# Altium PCB A313.2.PcbDoc (part 2 of 3)
Units mm, origin at the board's own origin, x right, y up, seen from the top; angles counter-clockwise.
Board outline 230.01 x 157.01 mm, 2 copper layers (Top Layer, Bottom Layer); 268 components, 266 nets, 1114 pads, 1214 vias.
Unrouted connection lines stored in the file: 2.
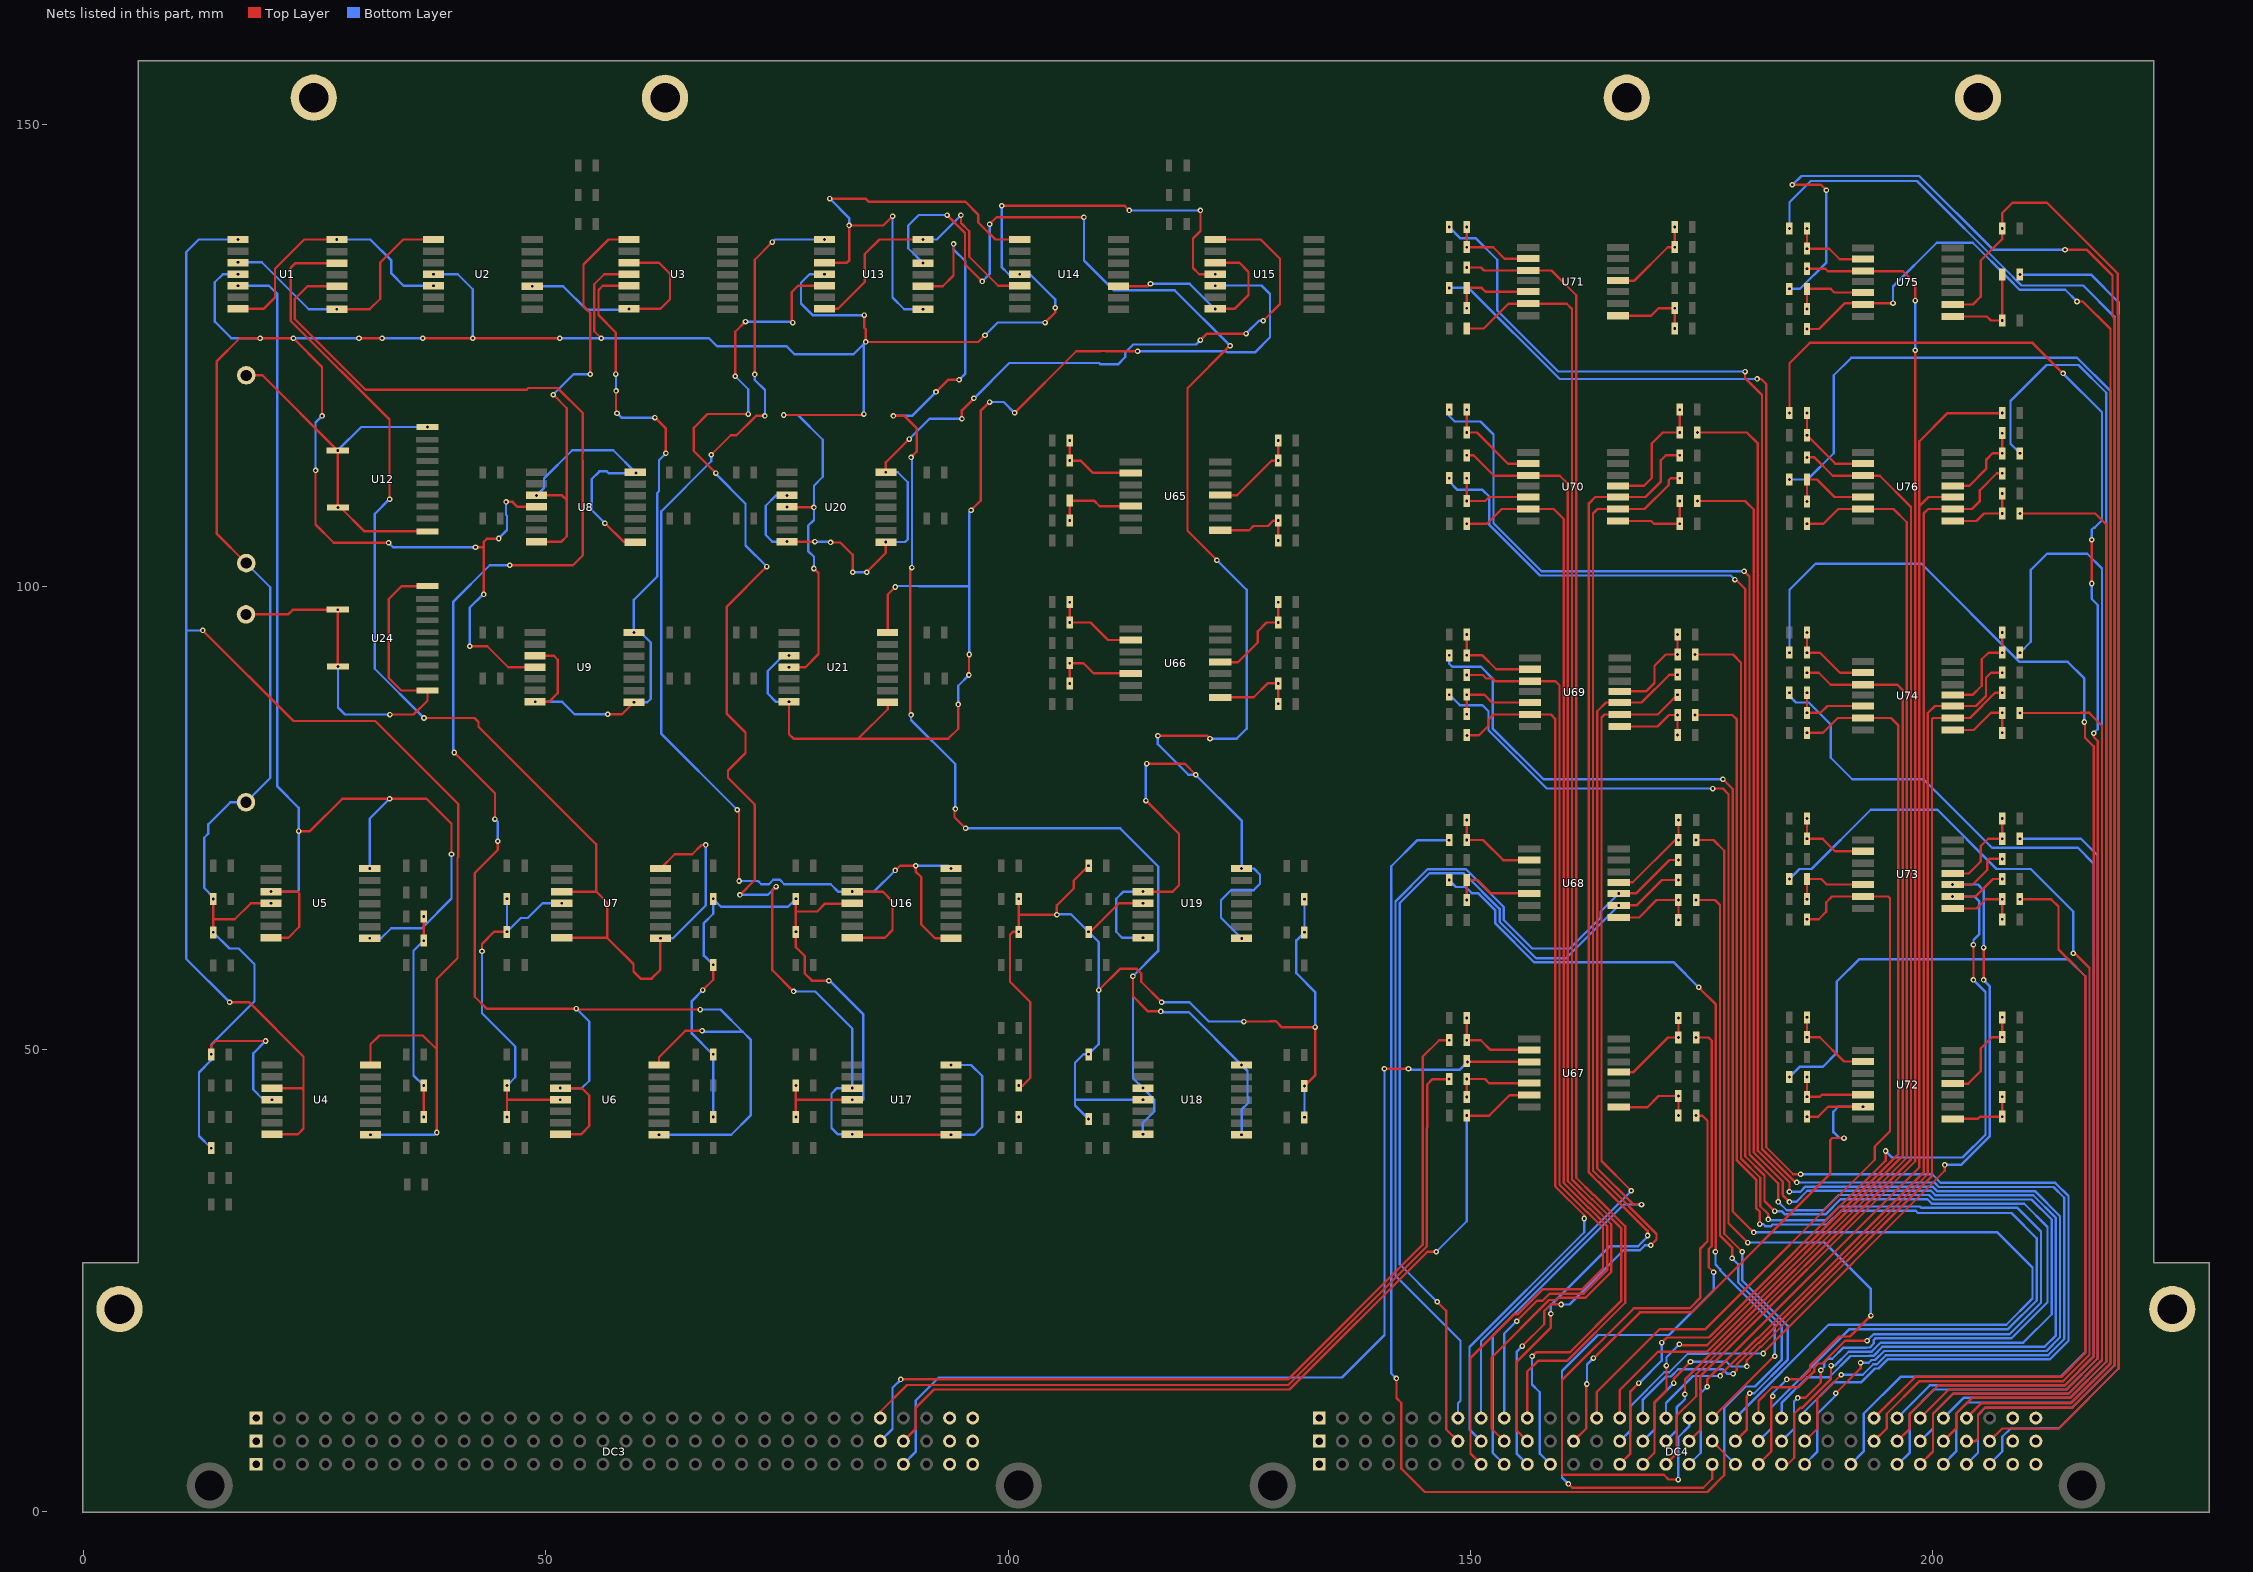
[diagram p2: the nets of this part, all layers, seen from the top]

## Via types
v1: diameter 0.6, hole 0.3, Top Layer to Bottom Layer, 1214 vias

## Nets (pads, with @x,y where several pads share a name; then routed paths per layer and width w, separated by ;. In a path a pad name is that pad's centre, name@x,y a point inside that pad or via, vN(x,y) a via of type N, cw(c..) or ccw(c..) an arc to the next point about the centre after c; other vN are vias at no path point) (continued)
A: D1.1 D2.1 DC3.A1 DC3.A31 DC3.A32 DC3.B1 DC3.B31 DC3.B32 DC3.C1 DC3.C31 DC3.C32 DC4.A1 DC4.A31 DC4.A32 DC4.B1 DC4.B31 DC4.B32 DC4.C1 DC4.C31 DC4.C32 pad.2 R17.2 R19.2 R21.2 R23.2 R25.2 R27.2 R29.2 R31.2 R33.2 R35.2 R37.2 R39.2 R41.2 R43.2 R45.2 R47.2 R64.2 R66.2 R68.2 R70.2 R72.2 R74.2 R76.2 R78.2 R80.2 R82.2 R84.2 R86.2 R88.2 R90.2 R92.2 R94.2 U1.4 U2.4 U3.4 U4.4 U5.4 U6.4 U7.4 U8.4 U9.4 U13.4 U14.4 U15.4 U16.4 U17.4 U18.4 U19.4 U20.4 U21.4 | length 702.1
  Top Layer w0.254: v1(13.824,49.457) 13.824,50.424 14.3,50.9 v1(19.7,50.9) ; v1(14.024,62.656) 14.024,64.06 ; v1(14.024,66.253) 14.024,64.06 ; D1.1@17.6,102.573 14.4,105.773 14.4,124.4 16.9,126.9 v1(19.1,126.9) v1(22.7,126.9) 25.8,123.8 v1(25.8,118.5) ; v1(20.292,65.803) 18.103,65.803 16.36,64.06 14.024,64.06 ; v1(25.1,112.6) 25.1,106.753 27.072,104.781 v1(33,104.781) ; v1(29.8,126.9) v1(32.3,126.9) ; v1(36.7,126.9) v1(42.1,126.9) v1(51.5,126.9) ; v1(36.802,42.69) v1(36.802,46.074) ; v1(36.802,61.751) v1(36.802,64.353) ; v1(41.774,93.6) 43.669,93.6 45.943,91.326 U9.4@48.85,91.326 ; v1(42.4,104.3) 43.3,104.3 ; v1(43.1,60.6) 43.1,61.4 44.405,62.705 v1(45.8,62.705) ; v1(43.3,99.2) 43.3,104.3 ; v1(44.9,105.242) 44.858,105.2 43.62,105.2 43.3,104.88 43.3,104.3 ; v1(45.7,109.204) 46.409,109.204 46.955,108.658 U8.4@49,108.658 ; v1(45.8,42.69) 45.8,44.551 ; v1(45.8,46.074) 45.8,44.551 ; v1(51.575,44.551) 45.8,44.551 ; v1(56,126.9) 55.246,127.654 55.246,132.746 56.326,133.826 U3.4@58.995,133.826 ; v1(66.977,56.4) 68.101,57.524 v1(68.101,59.132) ; v1(75.738,118.6) 84.3,118.6 v1(84.4,118.7) ; v1(76.1,108.658) 76.15,108.608 v1(79,108.608) ; v1(76.3,91.326) 78.077,91.326 79.5,92.749 79.5,101.5 v1(79,102) ; v1(77.049,42.69) 77.049,44.646 ; v1(77.049,46.074) 77.049,44.646 ; v1(77.049,66.277) 77.049,64.9 ; v1(80.624,57.424) 78.776,57.424 78,58.2 78,60.094 77.049,61.044 v1(77.049,62.705) 77.049,64.9 ; v1(83.147,44.551) 77.143,44.551 77.049,44.646 ; U16.4@83.147,65.803 83.097,65.753 80.205,65.753 79.353,64.9 77.049,64.9 ; v1(84.45,129.401) 84.45,128.025 84.6,127.876 v1(84.6,126.5) 96.773,126.5 v1(97.5,127.227) ; v1(99.3,141.219) 112.605,141.219 v1(113.1,140.724) ; v1(101.15,46.074) 101.574,46.074 102.4,46.9 102.4,55.1 100.2,57.3 100.2,62.38 100.525,62.705 v1(101.15,62.705) 101.15,64.653 ; v1(101.15,66.277) 101.15,64.653 ; v1(104,128.6) 105.1,129.7 v1(105.1,130.2) ; v1(108.7,62.705) 108.902,62.705 112,65.803 v1(114.575,65.803) ; v1(108.7,69.85) 107.1,68.25 107.1,67.4 105.276,65.576 v1(105.276,64.553) 101.25,64.553 101.15,64.653 ; v1(109.8,56.4) 112.1,58.7 113.9,58.7 114.4,58.2 114.4,57.3 v1(116.6,55.1) ; v1(120.8,140.724) 120.8,138.5 120,137.7 120,134.5 120.674,133.826 v1(122.4,133.826) ; v1(125.5,53) 128.326,53 128.353,53.027 128.955,53.027 129.582,52.4 v1(133.2,52.4) 133.2,47.173 v1(132.051,46.024)
  Bottom Layer w0.254: v1(13.824,39.307) 12.493,40.638 12.493,47.5 13.824,48.831 v1(13.824,49.457) 13.824,50.524 18.501,55.201 18.501,59.199 16.8,60.9 15.78,60.9 v1(14.024,62.656) ; v1(14.024,66.253) 14.024,66.476 13.054,67.446 13.054,72.881 13.5,73.327 13.5,74.328 15.886,76.715 D2.1@17.575,76.715 20.2,79.34 20.2,99.973 D1.1@17.6,102.573 ; v1(16.725,133.826) 15.075,133.826 14.2,132.951 14.2,128.7 16,126.9 v1(19.1,126.9) ; v1(19.7,50.9) 18.354,49.554 18.354,45.646 19.449,44.551 v1(20.375,44.551) ; v1(22.7,126.9) v1(29.8,126.9) ; v1(25.1,112.6) 25.1,117.8 v1(25.8,118.5) ; v1(32.3,126.9) v1(36.7,126.9) ; v1(33,104.781) 33.481,104.3 v1(42.4,104.3) ; v1(36.802,46.074) 35.7,47.176 35.7,60.649 v1(36.802,61.751) ; v1(37.86,133.826) 40.474,133.826 42.1,132.2 v1(42.1,126.9) ; v1(41.774,93.6) 41.774,97.773 43.201,99.2 v1(43.3,99.2) ; v1(43.1,60.6) 43.1,53.9 46.7,50.3 46.7,46.974 v1(45.8,46.074) ; v1(44.9,105.242) 45.812,106.154 45.812,107.709 45.7,107.821 v1(45.7,109.204) ; v1(45.8,66.277) v1(45.8,62.705) 47.296,64.2 48.047,64.2 49.65,65.803 v1(51.719,65.803) ; v1(51.5,126.9) v1(56,126.9) 67.658,126.9 68.531,126.027 76.045,126.027 76.899,125.173 83.273,125.173 v1@84.4,126.3 ; v1(66.977,56.4) 65.8,55.223 65.8,51.7 68.043,49.457 v1(68.101,49.457) v1(68.101,42.69) ; v1(68.101,59.132) 67.1,60.133 67.1,63.654 68.101,64.655 v1(68.101,66.277) 68.978,65.4 76.172,65.4 v1(77.049,66.277) ; v1(75.738,118.6) 77.281,118.6 79.954,115.927 79.954,111.912 79,110.958 v1(79,108.608) 79,107.242 78.373,106.615 78.373,103.902 79,103.275 v1(79,102) ; v1(80.13,133.826) 78.526,133.826 77.6,132.9 77.6,130.657 78.856,129.401 v1(84.45,129.401) ; v1(80.624,57.424) 80.624,57.5 84.351,53.773 84.351,44.551 v1(83.147,44.551) ; v1(84.4,118.7) v1@84.4,126.3 ; v1(84.6,126.5) v1@84.4,126.3 ; v1(97.5,127.227) 98.873,128.6 v1(104,128.6) ; v1(99.3,141.219) 99.3,134.6 100.074,133.826 v1(101.265,133.826) 102.374,133.826 105.1,131.1 v1(105.1,130.2) ; v1(105.276,64.553) 105.324,64.6 106.805,64.6 v1(108.7,62.705) 109.8,61.605 v1(109.8,56.4) 109.8,50.557 v1(108.7,49.457) 108.157,49.457 107.239,48.539 107.239,44.6 ; v1(108.7,42.471) 107.239,43.933 107.239,44.6 ; v1(113.1,140.724) v1(120.8,140.724) ; v1(114.575,44.551) 107.287,44.551 107.239,44.6 ; v1(116.6,55.1) 119.6,55.1 121.7,53 v1(125.5,53) ; v1(132.051,42.64) v1(132.051,46.024) ; v1(132.051,66.227) v1(132.051,62.655) 131.173,61.777 131.173,58.227 133.2,56.2 v1(133.2,52.4)
  other v1: 101.15,42.69
AP_NU: DC4.A8 R143.2 U69.3 | length 105.8
  Top Layer w0.254: v1(149.599,90.481) 151.324,90.481 151.705,90.1 152.4,90.1 152.696,89.804 U69.3@156.45,89.804 159.196,89.804 159.63,89.37 159.63,35.36 162.563,32.427 162.601,32.427 164.329,30.699 164.329,26.305 162.059,24.035 157.793,24.035 155.085,21.327 154.699,21.327 150,16.628 150,6.271 DC4.A8@151.15,5.121
"AP_NU TTL": DC4.C19 R147.1 | length 161.8
  Top Layer w0.254: v1(177.3,79.2) 178.36,78.14 178.36,32.47 v1(180.63,30.2)
  Bottom Layer w0.254: v1(147.699,92.606) 147.699,91.701 148.014,91.386 151.114,91.386 152.4,90.1 152.4,84.7 157.9,79.2 v1(177.3,79.2) ; DC4.C19@178.65,10.121 188.729,20.2 207.958,20.2 210.792,23.034 210.792,26.408 207,30.2 v1(180.63,30.2)
"C1 TTL": DC4.C17 R125.1 | length 69.7
  Top Layer w0.254: v1(172.47,3.471) 171.429,3.471 170.906,3.994 160.034,3.994 159.9,4.128 159.9,14.228 167.677,22.005 173.737,22.005 174.873,23.141 174.873,28.473 175.636,29.236 175.636,42.273 175.079,42.831 v1(174.399,42.831)
  Bottom Layer w0.254: v1(172.47,3.471) 172.47,8.035 173.65,9.215 DC4.C17@173.65,10.121
"C2 TTL": DC4.A18 R128.1 | length 79.4
  Top Layer w0.254: v1(160.6,3) 161.027,2.573 175.173,2.573 176.15,3.55 DC4.A18@176.15,5.121 ; v1(174.399,51.282) 175.762,51.282 176.09,50.954 176.09,28.718 175.773,28.401 175.773,26.427 v1(176.3,25.9)
  Bottom Layer w0.254: v1(160.6,3) 159.9,3.7 159.9,15.2 163.8,19.1 171.474,19.1 176.3,23.926 v1(176.3,25.9)
"C3 TTL": DC4.B18 R135.1 | length 114
  Top Layer w0.254: v1(142,14.4) 142,12.3 142.523,11.777 142.523,4.654 145.058,2.119 175.623,2.119 177.452,3.948 177.452,6.319 DC4.B18@176.15,7.621 ; v1(147.676,72.62) R135.1@147.699,72.642
  Bottom Layer w0.254: v1(142,14.4) 141.446,14.954 141.446,69.807 144.259,72.62 v1(147.676,72.62)
"C4 TTL": DC4.C18 R136.1 | length 85.5
  Top Layer w0.254: v1(174.7,56.7) 176.544,54.856 176.544,28.144 v1(176.5,28.1) ; DC4.C18@176.15,10.121 182.829,16.8 v1(182.9,16.8)
  Bottom Layer w0.254: v1(147.699,68.307) 148.449,67.557 149.481,67.557 150.149,66.889 150.811,66.889 152.7,65 152.7,63.6 156.9,59.4 172,59.4 v1(174.7,56.7) ; v1(176.5,28.1) 176.5,26.728 177.027,26.201 177.027,26.089 182.9,20.216 v1(182.9,16.8)
"CONTR COD": DC4.B7 R133.2 U68.9 | length 100.4
  Top Layer w0.254: v1(146.4,22.7) 147.373,21.727 147.373,8.898 DC4.B7@148.65,7.621 ; v1(166.05,65.561) 167.961,65.561 170.707,68.307 v1(172.499,68.307)
  Bottom Layer w0.254: v1(146.4,22.7) 142.354,26.746 142.354,65.812 145.576,69.034 149.308,69.034 153.154,65.188 153.154,63.788 157.088,59.854 160.343,59.854 v1(166.05,65.561)
"CONTR COD TTL": DC4.A19 R137.1 | length 69.7
  Top Layer w0.254: v1(174.399,66.139) 176.461,66.139 176.998,65.602 176.998,29.86 178.3,28.558 v1(178.3,27.4)
  Bottom Layer w0.254: v1(178.3,27.4) 178.946,26.754 178.946,24.812 183.658,20.1 183.658,16.413 180.772,13.527 179.777,13.527 177.452,11.202 177.452,6.319 DC4.A19@178.65,5.121
DUBI1: DC4.C29 R216.2 U75.6 | length 171.5
  Top Layer w0.254: v1(186.399,127.906) 187.706,127.906 190.5,130.7 v1(195.7,130.7) ; DC4.C29@203.65,10.121 205.231,11.702 214.9,11.702 219.215,16.018 219.215,127.885 216.223,130.877 v1(215.6,130.877)
  Bottom Layer w0.254: v1(195.7,130.7) 195.7,132.5 200.432,137.232 204.326,137.232 208.243,133.315 208.243,133.297 209.394,132.146 214.331,132.146 v1(215.6,130.877)
DUBI1TTL: DC4.B29 R220.1 | length 195.3
  Top Layer w0.254: v1(184.8,143.5) 187.9,143.5 v1(188.5,142.9) ; DC4.B29@203.65,7.621 204.621,7.621 204.9,7.9 204.9,10.465 205.683,11.248 215.088,11.248 219.669,15.829 219.669,129.048 219.446,129.271 219.446,133.671 216.634,136.482 v1(214.3,136.482)
  Bottom Layer w0.254: v1(184.499,132.246) 185.65,132.246 188.5,135.096 v1(188.5,142.9) ; v1(184.8,143.5) 184.846,143.5 185.8,144.454 198.529,144.454 206.501,136.482 v1(214.3,136.482)
DUBI2: DC4.B30 R217.2 U75.9 | length 165.2
  Top Layer w0.254: U75.9@202.148,130.552 204.352,130.552 205.2,131.4 205.2,135.3 207.524,137.624 v1(207.524,138.756) 207.524,140.45 208.625,141.551 212.349,141.551 220,133.9 220,129.5 220.123,129.377 220.123,15.5 213.617,8.994 207.523,8.994 DC4.B30@206.15,7.621
DUBI2TTL: DC4.A30 R221.1 | length 146.4
  Bottom Layer w0.254: DC4.A30@206.15,5.121 207.523,6.494 207.523,8.088 208.429,8.994 211.617,8.994 211.623,9 213.623,9 220.123,15.5 220.123,130.777 217.114,133.786 v1(209.424,133.786)
INT_NU: DC4.B8 R144.2 U69.6 | length 96.2
  Top Layer w0.254: R144.2@149.599,83.981 v1(149.634,83.946) 150.9,83.946 151.946,84.992 151.946,85.646 152.505,86.205 U69.6@156.45,86.205 158.704,86.205 159.176,85.733 159.176,35.172 162.3,32.048 v1(162.3,31.7)
  Bottom Layer w0.254: DC4.B8@151.15,7.621 149.9,8.871 149.9,17.812 162.3,30.212 v1(162.3,31.7)
"INT_NU TTL": DC4.A20 R148.1 | length 126.2
  Top Layer w0.254: v1(176.2,78.2) 177.3,78.2 177.906,77.594 177.906,31.194 v1(180,29.1) ; DC4.A20@181.15,5.121 182.523,6.494 182.523,12.307 v1(182.7,12.484) ; v1(184.2,14.3) 185.688,14.3 186.718,15.33 186.718,15.789 189.863,18.934 191.042,18.934 v1(193.308,21.2)
  Bottom Layer w0.254: v1(147.699,88.356) 148.855,87.2 151.3,87.2 151.946,86.554 151.946,84.512 158.258,78.2 v1(176.2,78.2) ; v1(180,29.1) 188.3,29.1 193.308,24.092 v1(193.308,21.2) ; v1(182.7,12.484) 182.7,12.8 v1(184.2,14.3)
KNAC: DC4.C7 R134.2 U68.10 | length 99.7
  Top Layer w0.254: v1(166.05,66.86) 167.9,66.86 171.514,70.474 v1(172.499,70.474)
  Bottom Layer w0.254: DC4.C7@148.65,10.121 148.65,11.723 148.927,12 148.927,18.473 141.9,25.5 141.9,66 145.388,69.488 149.496,69.488 153.608,65.376 153.608,63.976 156.684,60.9 160.747,60.9 164.1,64.253 164.1,64.91 v1(166.05,66.86)
"KNAC TTL": DC4.B19 R138.1 | length 72.9
  Top Layer w0.254: v1(174.399,72.642) 176.282,72.642 177.452,71.472 177.452,30.048 v1(179.4,28.1) ; DC4.B19@178.65,7.621 179.9,8.871 179.9,12.5 v1(180.2,12.8)
  Bottom Layer w0.254: v1(179.4,28.1) 179.4,25 184.3,20.1 184.3,16.413 180.687,12.8 v1(180.2,12.8)
NetD1_2: D1.2 U12.9 U12.10 U12.11 U12.12 | length 40.9
  Top Layer w0.254: D1.2@17.6,122.893 19.355,122.893 v1(27.489,114.759) 27.489,108.631 27.768,108.631 30.384,106.016 U12.12@37.199,106.016
  Bottom Layer w0.254: v1(27.489,114.759) 30.036,117.306 v1(37.199,117.306)
  other v1: 27.522,108.598
NetD2_2: D2.2 U24.9 U24.10 U24.11 U24.12 | length 50.5
  Top Layer w0.254: D2.2@17.575,97.035 22.135,97.035 22.646,97.546 v1(27.489,97.546) 27.489,91.419 v1(27.522,91.386) ; v1(33.142,86.205) 35.705,86.205 37.199,87.699 U24.12@37.199,88.803 34.372,88.803 33,90.175 33,98.673 34.42,100.093 U24.9@37.199,100.093
  Bottom Layer w0.254: v1(27.522,91.386) 27.522,86.978 28.295,86.205 v1(33.142,86.205)
NetR95_2: R95.2 R96.1 U65.2 | length 9.3
  Top Layer w0.254: v1(106.676,115.832) v1(106.676,113.669) 107.831,113.669 109.164,112.336 U65.2@113.258,112.336
NetR98_2: R98.2 R99.1 U65.5 | length 9
  Top Layer w0.254: v1(106.676,107.181) R98.2@106.676,109.344 109.293,109.344 109.901,108.736 U65.5@113.258,108.736
NetR101_2: R101.2 R102.1 U65.8 | length 8.9
  Top Layer w0.254: U65.8@122.958,106.136 126.078,106.136 126.542,106.6 128.093,106.6 128.674,107.181 v1(129.224,107.181) v1(129.224,105.018)
NetR104_2: R104.2 R105.1 U65.11 | length 10
  Top Layer w0.254: U65.11@122.958,109.936 124.788,109.936 128.521,113.669 v1(129.224,113.669) v1(129.224,115.832)
NetR107_2: R107.2 R108.1 U66.2 | length 9.6
  Top Layer w0.254: v1(106.676,98.35) v1(106.676,96.152) 108.924,96.152 110.813,94.264 U66.2@113.258,94.264
NetR110_2: R110.2 R111.1 U66.5 | length 9.2
  Top Layer w0.254: v1(106.676,89.559) v1(106.676,91.757) 108.143,91.757 109.236,90.664 U66.5@113.258,90.664
NetR113_2: R113.2 R114.1 U66.8 | length 9.1
  Top Layer w0.254: U66.8@122.958,88.064 126.564,88.064 128.1,89.6 129.183,89.6 v1(129.224,89.559) v1(129.224,87.361)
NetR116_2: R116.2 R117.1 U66.11 | length 10.9
  Top Layer w0.254: U66.11@122.958,91.864 124.864,91.864 127,94 127,95.2 127.952,96.152 v1(129.224,96.152) v1(129.224,98.35)
NetR119_2: R119.2 R120.1 U67.2 | length 9.6
  Top Layer w0.254: v1(149.599,53.395) v1(149.599,50.981) 151.119,50.981 152.164,49.936 U67.2@156.35,49.936
NetR122_2: R122.2 R123.1 U67.5 | length 8.9
  Top Layer w0.254: v1(149.599,44.845) v1(149.599,46.781) 151.566,46.781 152.011,46.336 U67.5@156.35,46.336
NetR125_2: R125.2 R126.1 U67.8 | length 9.1
  Top Layer w0.254: U67.8@166.05,43.737 169.137,43.737 170.344,44.944 v1(172.499,44.944) v1(172.499,42.831)
NetR128_2: R128.2 R129.1 U67.11 | length 10.1
  Top Layer w0.254: U67.11@166.05,47.536 167.636,47.536 171.382,51.282 v1(172.499,51.282) v1(172.499,53.395)
NetR135_2: R135.2 R139.1 U68.2 | length 9.8
  Top Layer w0.254: v1(149.599,74.81) v1(149.599,72.642) 151.358,72.642 153.54,70.46 U68.2@156.35,70.46
NetR136_2: R136.2 R140.1 U68.5 | length 9.5
  Top Layer w0.254: v1(149.599,66.139) R136.2@149.599,68.307 150.793,68.307 152.24,66.86 U68.5@156.35,66.86
NetR137_2: R137.2 R141.1 U68.8 | length 9.4
  Top Layer w0.254: U68.8@166.05,64.261 168.261,64.261 170.139,66.139 v1(172.499,66.139) v1(172.499,63.971)
NetR138_2: R138.2 R142.1 U68.11 | length 10.5
  Top Layer w0.254: U68.11@166.05,68.061 167.561,68.061 172.142,72.642 v1(172.499,72.642) v1(172.499,74.81)
NetR147_2: R147.2 R151.1 U69.2 | length 9.7
  Top Layer w0.254: v1(149.599,94.87) v1(149.599,92.606) 151.294,92.606 152.796,91.104 U69.2@156.45,91.104
NetR148_2: R148.2 R152.1 U69.5 | length 9.3
  Top Layer w0.254: v1(149.599,86.245) v1(149.599,88.356) 151.49,88.356 152.342,87.504 U69.5@156.45,87.504
NetR149_2: R149.2 R153.1 U69.8 | length 8.9
  Top Layer w0.254: U69.8@166.15,84.905 170.235,84.905 171.489,86.159 v1(172.399,86.159) v1(172.399,83.981)
NetR150_2: R150.2 R154.1 U69.11 | length 11.2
  Top Layer w0.254: U69.11@166.15,88.705 168.976,88.705 169.9,89.628 169.9,91.476 171.116,92.692 v1(172.399,92.692) v1(172.399,94.87)
NetR159_2: R159.2 R163.1 U70.2 | length 10.5
  Top Layer w0.254: v1(149.599,119.171) v1(149.599,116.704) 150.704,116.704 154.073,113.336 U70.2@156.25,113.336
NetR160_2: R160.2 R164.1 U70.5 | length 9.3
  Top Layer w0.254: v1(149.599,111.771) v1(149.599,109.304) 151.596,109.304 152.028,109.736 U70.5@156.25,109.736
NetR161_2: R161.2 R165.1 U70.8 | length 9.3
  Top Layer w0.254: U70.8@165.95,107.137 169.563,107.137 169.862,106.838 v1(172.649,106.838) v1(172.649,109.304)
NetR162_2: R162.2 R166.1 U70.11 | length 13.7
  Top Layer w0.254: U70.11@165.95,110.936 168.735,110.936 169.6,111.801 169.6,115.504 170.8,116.704 v1(172.649,116.704) v1(172.649,119.171)
NetR171_2: R171.2 R175.1 U71.2 | length 9.4
  Top Layer w0.254: v1(149.599,138.941) v1(149.599,136.743) 152.457,136.743 153.7,135.5 156.217,135.5 U71.2@156.25,135.533
NetR172_2: R172.2 R176.1 U71.5 | length 9
  Top Layer w0.254: v1(149.599,130.15) R172.2@149.599,132.347 151.207,132.347 151.621,131.933 U71.5@156.25,131.933
NetR173_2: R173.2 R177.1 U71.8 | length 8.7
  Top Layer w0.254: U71.8@165.95,129.334 169.534,129.334 170.35,130.15 v1(172.099,130.15) v1(172.099,127.952)
NetR174_2: R174.2 R178.1 U71.11 | length 9.8
  Top Layer w0.254: U71.11@165.95,133.133 167.733,133.133 171.343,136.743 v1(172.099,136.743) v1(172.099,138.941)
NetR183_2: R183.2 R187.1 U72.2 | length 9.3
  Top Layer w0.254: v1(186.399,53.456) v1(186.399,51.308) 187.782,51.308 190.404,48.685 U72.2@192.448,48.685
NetR184_2: R184.2 R188.1 U72.5 | length 8.3
  Top Layer w0.254: v1(186.399,47.012) v1(186.399,44.865) 187.81,44.865 188.03,45.085 U72.5@192.448,45.085
NetR185_2: R185.2 R189.1 U72.8 | length 7.6
  Top Layer w0.254: U72.8@202.148,42.486 204.9,42.486 205.131,42.717 v1(207.524,42.717) v1(207.524,44.865)
NetR186_2: R186.2 R190.1 U72.11 | length 11
  Top Layer w0.254: U72.11@202.148,46.286 203.842,46.286 205.2,47.643 205.2,50.1 206.408,51.308 v1(207.524,51.308) v1(207.524,53.456)
NetR195_2: R195.2 R199.1 U73.2 | length 8.8
  Top Layer w0.254: v1(186.399,74.949) v1(186.399,72.771) 188.09,72.771 189.441,71.419 U73.2@192.448,71.419
NetR196_2: R196.2 R200.1 U73.5 | length 8.5
  Top Layer w0.254: v1(186.399,66.238) R196.2@186.399,68.415 187.945,68.415 188.541,67.819 U73.5@192.448,67.819
NetR197_2: R197.2 R201.1 U73.8 | length 8
  Top Layer w0.254: U73.8@202.148,65.22 204.72,65.22 205.738,66.238 v1(207.524,66.238) v1(207.524,64.06)
NetR198_2: R198.2 R202.1 U73.11 | length 10.1
  Top Layer w0.254: U73.11@202.148,69.02 203.9,69.02 205.2,70.319 205.2,71.979 205.992,72.771 v1(207.524,72.771) v1(207.524,74.949)
NetR207_2: R207.2 R211.1 U74.2 | length 9.1
  Top Layer w0.254: v1(186.399,95.065) v1(186.399,92.897) 187.803,92.897 189.971,90.729 U74.2@192.448,90.729
NetR208_2: R208.2 R212.1 U74.5 | length 8.5
  Top Layer w0.254: v1(186.399,88.562) 186.399,86.394 187.865,86.394 188.6,87.129 U74.5@192.448,87.129
  other v1: 186.399,86.394
NetR209_2: R209.2 R213.1 U74.8 | length 8.3
  Top Layer w0.254: U74.8@202.148,84.529 204.429,84.529 206.294,86.394 v1(207.524,86.394) v1(207.524,84.226)
NetR210_2: R210.2 R214.1 U74.11 | length 11.1
  Top Layer w0.254: U74.11@202.148,88.329 204.309,88.329 205.3,89.32 205.3,92.176 206.021,92.897 v1(207.524,92.897) v1(207.524,95.065)
NetR219_2: R219.2 R223.1 U75.2 | length 8.7
  Top Layer w0.254: v1(186.399,138.756) v1(186.399,136.586) 188.814,136.586 189.949,135.451 U75.2@192.448,135.451
NetR220_2: R220.2 R224.1 U75.5 | length 8.4
  Top Layer w0.254: v1(186.399,130.076) R220.2@186.399,132.246 188.954,132.246 189.349,131.851 U75.5@192.448,131.851
NetR221_2: R221.2 R225.1 U75.8 | length 10.5
  Top Layer w0.254: U75.8@202.148,129.252 205.848,129.252 206.283,128.817 v1(207.524,128.817) R221.2@207.524,133.786
NetR226_2: R226.2 R227.1 U76.2 | length 9.7
  Top Layer w0.254: v1(186.399,118.802) v1(186.399,116.409) 189.472,113.336 U76.2@192.448,113.336
NetR229_2: R229.2 R230.1 U76.5 | length 9.2
  Top Layer w0.254: v1(186.399,109.23) R229.2@186.399,111.623 187.477,111.623 189.364,109.736 U76.5@192.448,109.736
NetR232_2: R232.2 R233.1 U76.8 | length 7.9
  Top Layer w0.254: U76.8@202.148,107.137 204.737,107.137 205.552,107.952 v1(207.524,107.952) v1(207.524,110.122)
NetR235_2: R235.2 R236.1 U76.11 | length 9.6
  Top Layer w0.254: U76.11@202.148,110.936 203.936,110.936 205.8,112.8 205.8,113.8 206.462,114.462 v1(207.524,114.462) v1(207.524,116.632)
NetU1_1: U1.1 U4.3 U4.7 U4.8 U4.14 | length 206.1
  Top Layer w0.254: v1(12.9,95.3) 22.7,85.5 31.558,85.5 40.527,76.531 40.527,70.801 40.446,70.72 40.446,59.846 38.201,57.601 38.201,49.999 ; v1(15.8,55.1) 17.9,55.1 23.8,49.2 23.8,45.6 ; U4.7@20.375,40.801 23.176,40.801 23.8,41.425 23.8,45.6 ; U4.3@20.375,45.801 23.599,45.801 23.8,45.6 ; U4.14@31.05,48.301 31.05,50.55 32,51.5 36.7,51.5 38.201,49.999 ; v1(38.201,41) 38.201,49.999
  Bottom Layer w0.254: v1(12.9,95.3) 11.2,95.3 11.1,95.2 ; v1(15.8,55.1) 11.1,59.8 11.1,95.2 ; v1(16.725,137.576) 12.476,137.576 11.1,136.2 11.1,95.2 ; v1(31.05,40.751) 37.952,40.751 v1(38.201,41)
NetU1_3: U1.3 U1.8 U2.1 | length 28.7
  Top Layer w0.254: U1.3@16.725,135.076 v1(16.725,135.125) ; v1(27.4,130.026) 30.949,130.026 32.1,131.177 32.1,135.1 34.576,137.576 U2.1@37.86,137.576
  Bottom Layer w0.254: v1(16.725,135.125) 19.275,135.125 24.374,130.026 v1(27.4,130.026)
NetU1_5: U1.5 U5.3 U5.7 U5.8 U5.14 | length 129.6
  Top Layer w0.254: U5.7@20.292,62.053 22.153,62.053 23.346,63.246 23.346,66.854 23.147,67.053 v1(20.292,67.053) ; v1(23.288,73.6) 24.5,73.6 28,77.1 v1(33.1,77.1) 37.1,77.1 39.8,74.4 v1(39.8,71.102)
  Bottom Layer w0.254: v1(16.725,132.576) 20.071,132.576 20.973,131.674 20.973,78.424 23.288,76.109 v1(23.288,73.6) 23.288,67.193 23.147,67.053 v1(20.292,67.053) ; v1(30.967,62.003) 32.19,62.003 33.288,63.1 36.6,63.1 39.8,66.3 v1(39.8,71.102) ; v1(30.967,69.553) 30.967,74.967 v1(33.1,77.1)
NetU1_7: U1.7 U1.14 U2.5 | length 28.9
  Top Layer w0.254: U1.7@16.725,130.076 19.476,130.076 20.721,131.321 20.721,134.421 23.876,137.576 v1(27.4,137.576)
  Bottom Layer w0.254: v1(27.4,137.576) 31.024,137.576 33.3,135.3 33.3,133.9 34.624,132.576 v1(37.86,132.576)
NetU1_10: U1.10 U6.3 U6.7 U6.8 U6.14 | length 204
  Top Layer w0.254: U1.10@27.4,132.526 24.226,132.526 22.854,131.154 22.854,128.988 30.523,121.319 47.902,121.319 48.11,121.527 51.273,121.527 54,118.8 54,114.428 53.973,114.401 53.973,113.699 54,113.672 54,103.4 52.944,102.344 v1(46.1,102.344) ; v1(40.1,82.1) 44.5,77.7 v1(44.5,74.9) ; v1(44.8,72.5) 44.8,71.567 42.308,69.075 42.308,55.692 43.6,54.4 v1(53.3,54.4) 53.4,54.3 v1(66.7,54.3) ; U6.7@51.575,40.801 53.801,40.801 54.7,41.7 54.7,45 53.899,45.801 v1(51.575,45.801) ; U6.14@62.25,48.301 62.25,49.15 65.1,52 v1(66.905,52)
  Bottom Layer w0.254: v1(40.1,82.1) 39.973,82.227 39.973,98.373 43.944,102.344 v1(46.1,102.344) ; v1(44.5,74.9) 44.8,74.6 v1(44.8,72.5) ; v1(51.575,45.801) 53.899,45.801 54.7,46.602 54.7,53 v1(53.3,54.4) ; v1(62.25,40.751) 70.051,40.751 72.153,42.853 72.153,51.047 71.3,51.9 ; v1(66.7,54.3) 68.9,54.3 71.3,51.9 ; v1(66.905,52) 67.005,51.9 71.3,51.9
NetU1_12: U1.12 U7.3 U7.7 U7.8 U7.14 | length 135.8
  Top Layer w0.254: U1.12@27.4,135.026 22.926,135.026 22.4,134.5 22.4,128.8 33.1,118.1 v1(33.1,109.5) ; v1(36.829,85.829) 42.3,85.829 42.721,85.408 42.721,84.887 55.447,72.161 55.447,67.053 ; U7.7@51.719,62.053 56.647,62.053 ; U7.3@51.719,67.053 55.447,67.053 ; v1(62.394,62.003) 62.394,58.594 61.446,57.646 60.254,57.646 59.481,58.419 59.481,59.219 56.647,62.053 ; U7.14@62.394,69.553 63.942,71.1 65.847,71.1 66.847,72.1 v1(67.3,72.1) ; 55.447,67.053 56.647,65.853 56.647,62.053
  Bottom Layer w0.254: v1(33.1,109.5) 31.503,107.903 31.503,91.154 v1(36.829,85.829) ; v1(62.394,62.003) 63.743,62.003 67.3,65.56 v1(67.3,72.1)
NetU2_10: U2.10 U3.3 U3.7 | length 24.1
  Top Layer w0.254: v1(58.995,130.076) 62.377,130.076 63.425,131.124 63.425,133.875 62.224,135.076 U3.3@58.995,135.076
  Bottom Layer w0.254: v1(48.535,132.526) 51.874,132.526 54.4,130 58.919,130 v1(58.995,130.076)
NetU3_1: U3.1 U8.3 U8.7 U8.8 U8.14 | length 75.3
  Top Layer w0.254: U8.7@49,104.908 51.699,104.908 52.271,105.481 52.271,109.394 ; v1(49,109.908) 51.756,109.908 52.271,109.394 ; v1(50.8,120.8) 52.271,119.329 52.271,109.394 ; v1(54.8,123) 54.792,123.008 54.792,129.666 54.077,130.381 54.077,134.877 56.776,137.576 U3.1@58.995,137.576 ; v1(56.4,106.9) 58.442,104.858 U8.8@59.675,104.858 ; U8.14@59.675,112.408 v1(59.77,112.313)
  Bottom Layer w0.254: v1(49,109.908) 49.8,110.708 49.8,111.725 52.853,114.778 57.305,114.778 v1(59.77,112.313) 56.786,112.313 56.601,112.498 55.798,112.498 54.954,111.654 54.954,108.346 v1(56.4,106.9) ; v1(50.8,120.8) 53,123 v1(54.8,123)
NetU3_5: U3.5 U9.3 U9.7 U9.8 U9.14 | length 78.3
  Top Layer w0.254: v1(48.85,87.576) 50.358,87.576 51.3,88.518 51.3,92.129 50.852,92.576 U9.3@48.85,92.576 ; v1(56.7,86.245) 58.243,86.245 v1(59.525,87.526) ; v1(57.572,123.02) 57.572,127.528 55.7,129.4 55.7,132.125 56.151,132.576 U3.5@58.995,132.576 ; v1(57.6,121.2) 57.6,118.9 v1(57.7,118.8) ; v1(61.8,118.315) 62.991,117.124 v1(62.991,114.462)
  Bottom Layer w0.254: v1(48.85,87.576) 51.785,87.576 53.116,86.245 v1(56.7,86.245) ; v1(57.572,123.02) 57.6,123.048 v1(57.6,121.2) ; v1(57.7,118.8) 58.185,118.315 v1(61.8,118.315) ; v1(59.525,87.526) 60.975,87.526 61.346,87.898 61.346,94 60.27,95.076 v1(59.525,95.076) 59.525,98.625 62.046,101.146 62.046,110.163 62.244,110.361 62.244,113.715 v1(62.991,114.462)
NetU13_1: U13.1 U16.3 U16.7 U16.8 U16.14 | length 133.2
  Top Layer w0.254: v1(67.9,114.3) 70.001,116.401 70.629,116.401 72.728,118.5 v1(73.7,118.5) ; v1(70.7,75.9) 70.9,75.7 v1(70.9,68.2) ; v1(72.6,122.993) 72.6,135.4 v1(74.5,137.3) ; U16.7@83.147,62.053 86.653,62.053 87.5,62.9 87.5,66 86.447,67.053 v1(83.147,67.053) ; v1(87.8,69.351) 88.299,69.85 v1(90,69.85) 90,69.232 90.6,68.632 90.6,63.505 92.103,62.003 U16.8@93.822,62.003
  Bottom Layer w0.254: v1(67.9,114.3) 67.9,113.6 62.5,108.2 62.5,84.1 v1(70.7,75.9) ; v1(70.9,68.2) 72.958,68.2 73.309,67.849 74.128,67.849 74.607,68.327 75.315,68.327 75.793,67.849 80.812,67.849 81.608,67.053 v1(83.147,67.053) 85.502,67.053 v1(87.8,69.351) ; v1(72.6,122.993) 72.6,122.393 73.7,121.293 v1(73.7,118.5) ; v1(74.5,137.3) 74.776,137.576 v1(80.13,137.576) ; v1(90,69.85) 93.525,69.85 v1(93.822,69.553)
NetU13_3: U13.3 U13.8 U14.1 | length 51
  Top Layer w0.254: U13.3@80.13,135.076 82.576,135.076 82.8,135.3 v1(82.8,139.1) 86.5,139.1 v1(87.5,140.1) ; v1(80.7,142) 84.572,142 84.899,141.673 95.369,141.673 96.754,140.288 96.754,139.45 98.628,137.576 U14.1@101.265,137.576
  Bottom Layer w0.254: v1(80.7,142) 82.8,139.9 v1(82.8,139.1) ; v1(87.5,140.1) 87.5,131.3 88.774,130.026 v1(90.805,130.026)
NetU13_5: U13.5 U17.3 U17.7 U17.8 U17.14 | length 152.8
  Top Layer w0.254: v1(68.4,112.313) 68.388,112.313 66,114.701 66,117.206 67.494,118.7 v1(71.9,118.7) ; v1(70.5,122.788) 70.5,127.6 v1(71.6,128.7) ; v1(71,66.7) 72.6,68.3 72.6,76.477 69.7,79.377 69.7,80.142 71.6,82.042 71.6,84.249 69.583,86.266 69.583,97.883 v1(73.9,102.2) ; v1(74.908,67.6) 74.508,67.2 74.508,58.551 v1(76.8,56.259) ; v1(76.7,128.6) 76.6,128.7 76.6,131.9 77.276,132.576 U13.5@80.13,132.576 ; v1(83.147,40.801) 83.197,40.751 v1(93.822,40.751)
  Bottom Layer w0.254: v1(68.4,112.313) 68.287,112.313 71.6,109 71.6,104.5 v1(73.9,102.2) ; v1(70.5,122.788) 71.9,121.388 v1(71.9,118.7) ; v1(71,66.7) 74.008,66.7 v1(74.908,67.6) ; v1(71.6,128.7) 76.6,128.7 v1(76.7,128.6) ; v1(76.8,56.259) 79.141,56.259 83.147,52.253 v1(83.147,45.801) 81.501,45.801 80.9,45.2 80.9,41.492 81.591,40.801 v1(83.147,40.801) ; v1(93.822,40.751) 96.351,40.751 97.2,41.6 97.2,47.1 95.999,48.301 v1(93.822,48.301)
NetU13_7: U13.7 U13.14 U14.5 | length 32.3
  Top Layer w0.254: U13.7@80.13,130.076 81.576,130.076 84.5,133 84.5,136 86.076,137.576 v1(90.805,137.576) ; v1(94.9,140.2) 94.9,139.367 95.799,138.468 95.799,135.717 98.94,132.576 U14.5@101.265,132.576
  Bottom Layer w0.254: v1(90.805,137.576) 92.276,137.576 v1(94.9,140.2)
NetU13_10: U13.10 U18.3 U18.7 U18.8 U18.14 | length 160
  Top Layer w0.254: v1(87.6,118.5) 88.8,118.5 90.1,117.2 90.1,114.616 v1(89.5,114.016) ; v1(89.5,86.159) 89.4,86.259 89.4,101.9 v1(89.6,102.1) ; U13.10@90.805,132.526 92.926,132.526 94.1,133.7 v1(94.1,137.1) ; v1(92.2,121.1) 93.5,122.4 v1(94.7,122.4) ; v1(94.3,76) 94.3,75.8 94.2,75.7 94.2,75.1 v1(95.4,73.9) ; v1(113.5,57.9) 113.5,55.736 115.136,54.1 v1(116.5,54.1)
  Bottom Layer w0.254: v1(87.6,118.5) 89.6,118.5 v1(92.2,121.1) ; v1(89.5,86.159) 89.5,85.627 94.3,80.827 v1(94.3,76) ; v1(89.5,114.016) 89.6,113.916 v1(89.6,102.1) ; v1(94.1,137.1) 94.1,136.5 95.377,135.223 95.377,123.077 v1(94.7,122.4) ; v1(95.4,73.9) 112.115,73.9 116.246,69.769 116.246,62.268 116.219,62.241 116.219,60.619 v1(113.5,57.9) 113.5,46.876 v1(114.575,45.801) 115.8,44.576 115.8,43.276 114.575,42.051 v1(114.575,40.801) ; v1(116.5,54.1) 116.6,54 119.551,54 v1(125.25,48.301) 125.892,47.659 125.892,44.887 125.977,44.802 125.977,44.2 125.25,43.473 v1(125.25,40.751)
NetU13_12: U13.12 U19.3 U19.7 U19.8 U19.14 | length 189.1
  Top Layer w0.254: v1(93.4,140.225) 95.345,138.28 95.345,134.906 v1(97.2,133.051) ; v1(98,139.232) 98.75,139.982 v1(108.2,139.982) ; v1(114.575,67.053) 117.8,67.053 118.484,67.737 118.484,73.316 v1(114.9,76.9) ; v1(115,80.9) 119.1,80.9 v1(120.3,79.7) ; v1(116.2,83.9) 121.536,83.9 v1(121.836,83.6) ; v1(122.586,102.9) 119.4,106.086 119.4,121.5 v1(124,126.1) ; U19.8@125.25,62.003 v1(125.275,61.978)
  Bottom Layer w0.254: v1(90.805,135.026) 89.2,136.631 89.2,139.1 90.325,140.225 v1(93.4,140.225) ; v1(97.2,133.051) 98,133.851 v1(98,139.232) ; v1(108.2,139.982) 108.2,135.316 111.443,132.073 118.027,132.073 v1(124,126.1) ; v1(114.575,62.053) 112.353,62.053 111.7,62.705 111.7,66.285 112.468,67.053 v1(114.575,67.053) ; v1(114.9,76.9) 114.9,80.8 v1(115,80.9) ; v1(116.2,83.9) 116.2,83 119.5,79.7 120.276,79.7 125.25,74.726 ; v1(120.3,79.7) 125.25,74.75 125.25,74.726 ; v1(121.836,83.6) 124.728,83.6 125.792,84.664 125.792,99.694 v1(122.586,102.9) ; v1(125.275,61.978) 123.024,64.229 123.024,66.124 124.1,67.2 126.547,67.2 127.246,67.899 127.246,68.885 126.578,69.553 v1(125.25,69.553) 125.25,74.726
NetU14_10: U14.10 U15.3 U15.7 | length 22.4
  Top Layer w0.254: U14.10@111.94,132.526 115.126,132.526 v1(115.4,132.8) ; v1(122.4,130.076) 124.5,130.076 126,131.576 126,134.068 124.992,135.076 U15.3@122.4,135.076
  Bottom Layer w0.254: v1(115.4,132.8) 119.633,132.8 122.357,130.076 v1(122.4,130.076)
NetU15_1: U15.1 U20.3 U20.7 U20.8 U20.14 | length 99.7
  Top Layer w0.254: v1(76.1,104.908) v1(79.1,104.908) ; v1(80.8,104.817) 81.851,104.817 83.2,103.467 v1(83.2,101.6) ; v1(84.7,101.6) 86.775,103.675 v1(86.775,104.858) ; v1(86.775,112.408) 86.775,113.475 v1(89.3,116) ; v1(95,118.2) 95,119.1 v1(96.3,120.4) ; v1(120.8,126.7) 121.5,127.4 v1(125.736,127.4) ; U15.1@122.4,137.576 127.324,137.576 129.4,135.5 129.4,130.6 v1(127.6,128.8)
  Bottom Layer w0.254: v1(76.1,104.908) 74.492,104.908 73.783,105.617 73.783,108.785 74.907,109.908 v1(76.1,109.908) ; v1(79.1,104.908) 80.708,104.908 v1(80.8,104.817) ; v1(83.2,101.6) v1(84.7,101.6) ; v1(86.775,104.858) 88.858,104.858 89.146,105.146 89.146,111.336 88.074,112.408 v1(86.775,112.408) ; v1(89.3,116) 91.5,118.2 v1(95,118.2) ; v1(96.3,120.4) 100.123,124.223 101.145,124.223 101.149,124.227 101.752,124.227 101.756,124.223 109.849,124.223 109.999,124.073 111.873,124.073 112.673,124.873 112.673,125.373 113.527,126.227 120.327,126.227 v1(120.8,126.7) ; v1(125.736,127.4) 127.136,128.8 v1(127.6,128.8)
NetU15_5: U15.5 U21.3 U21.7 U21.8 U21.14 | length 131.1
  Top Layer w0.254: v1(76.3,87.576) 76.3,84.081 76.781,83.6 83.8,83.6 ; U21.8@86.975,87.526 86.975,86.775 83.8,83.6 ; U21.14@86.975,95.076 86.975,99.175 v1(87.8,100) ; v1(94.6,87.3) 94.6,84.676 93.524,83.6 83.8,83.6 ; v1(95.763,90.481) 95.763,92.663 v1(95.8,92.7) ; v1(96,108.3) 97.023,109.323 97.023,119.023 v1(98,120) ; v1(100.7,118.832) 107.368,125.5 109.972,125.5 109.999,125.527 110.601,125.527 110.628,125.5 v1(114,125.5)
  Bottom Layer w0.254: v1(76.3,87.576) 74.908,87.576 74.008,88.476 74.008,90.908 75.676,92.576 v1(76.3,92.576) ; v1(87.8,100) 87.9,100.1 90.372,100.1 90.399,100.073 95.773,100.073 95.8,100.1 ; v1(94.6,87.3) 94.6,89.318 v1(95.763,90.481) ; v1(95.8,92.7) 95.8,100.1 ; v1(96,108.3) 95.8,108.1 95.8,100.1 ; v1(98,120) 99.532,120 v1(100.7,118.832) ; v1(114,125.5) 123.572,125.5 123.699,125.373 126.698,125.373 128.327,127.002 128.327,131.673 127.4,132.6 122.424,132.6 v1(122.4,132.576)
"PODCL 1 TTL": DC3.B28 R119.1 | length 94
  Top Layer w0.254: v1(88.4,14.3) 130.258,14.3 144.827,28.869 144.827,49.184 146.624,50.981 v1(147.699,50.981)
  Bottom Layer w0.254: DC3.B28@86.175,7.621 87.5,8.946 87.5,13.4 v1(88.4,14.3)
"PODCL 2 TTL": DC3.C28 R122.1 | length 87.3
  Top Layer w0.254: DC3.C28@86.175,10.121 86.175,10.8 89.075,13.7 130.3,13.7 145.281,28.681 145.281,41.489 145.326,41.535 145.326,46.2 145.9,46.774 v1(147.692,46.774) R122.1@147.699,46.781
"PODCL. 1": DC3.A29 R121.2 U67.3 | length 106
  Top Layer w0.254: v1(140.7,47.9) v1(143.3,47.9) ; R121.2@149.599,48.731 v1(149.694,48.636) U67.3@156.35,48.636
  Bottom Layer w0.254: DC3.A29@88.675,5.121 90,6.446 90,12 92.5,14.5 136.1,14.5 140.7,19.1 v1(140.7,47.9) ; v1(143.3,47.9) 143.4,47.8 148.857,47.8 v1(149.694,48.636)
"PODCL. 2": DC3.B29 R124.2 U67.6 | length 91.2
  Top Layer w0.254: DC3.B29@88.675,7.621 90,8.946 90,11.2 92,13.2 130.442,13.2 145.342,28.1 v1(146.3,28.1) ; v1(149.599,42.831) 152.031,42.831 154.237,45.037 U67.6@156.35,45.037
  Bottom Layer w0.254: v1(146.3,28.1) 149.599,31.399 v1(149.599,42.831)
"UPR 4R RPR": DC4.C13 R192.2 U73.6 | length 82.9
  Top Layer w0.254: DC4.C13@163.65,10.121 163.65,12.901 170.484,19.735 175.409,19.735 193.719,38.045 193.719,39.489 195.376,41.146 195.376,66.324 195.18,66.52 U73.6@192.448,66.52 189.108,66.52 188.489,65.9 188.489,64.889 187.66,64.06 v1(186.399,64.06)
"UPR 4R RPR TTL": DC4.B25 R196.1 | length 115.2
  Top Layer w0.254: DC4.B25@193.65,7.621 195.023,8.994 195.023,10.588 198.551,14.116 214.103,14.116 216.945,16.958 216.945,58.8 215.345,60.4 v1(215.2,60.4)
  Bottom Layer w0.254: v1(184.499,68.415) 184.515,68.415 185.6,69.5 186.9,69.5 193.3,75.9 200.5,75.9 206.9,69.5 210.6,69.5 215.2,64.9 v1(215.2,60.4)
"UPR 5R RPR": DC4.A14 R193.2 U73.9 | length 95.9
  Top Layer w0.254: DC4.A14@166.15,5.121 167.3,6.271 167.3,13 v1(168.2,13.9) ; v1(170.7,18.281) 171.246,18.827 175.785,18.827 194.9,37.942 v1(194.9,39) ; v1(202.148,66.52) 204.62,66.52 206.516,68.416 v1(207.524,68.416) ; v1(204.4,57.5) v1(204.4,61.3)
  Bottom Layer w0.254: v1(168.2,13.9) 168.272,13.9 170.7,16.328 v1(170.7,18.281) ; v1(194.9,39) 195.6,38.3 203.228,38.3 205.696,40.768 205.696,56.204 v1(204.4,57.5) ; v1(202.148,66.52) 204.526,66.52 205.046,66 205.046,62.465 204.4,61.819 v1(204.4,61.3)
"UPR 5R RPR TTL": DC4.C25 R197.1 | length 79.7
  Top Layer w0.254: DC4.C25@193.65,10.121 198.099,14.57 213.915,14.57 216.491,17.146 216.491,57.909 213.6,60.8 213.6,65.438 212.8,66.238 v1(209.424,66.238)
"UPR 6R RPR": DC4.B14 R194.2 U73.10 | length 93.2
  Top Layer w0.254: v1(181.662,17.1) 181.662,17.222 201.3,36.86 v1(201.3,37.5) ; v1(202.148,67.819) 204.319,67.819 205.9,69.4 205.9,70.343 206.15,70.593 v1(207.524,70.593) ; v1(205.5,57.5) v1(205.5,61)
  Bottom Layer w0.254: DC4.B14@166.15,7.621 167.3,8.771 167.3,11.402 170.971,15.073 171.501,15.073 173.5,17.072 175.572,17.072 175.6,17.1 v1(181.662,17.1) ; v1(201.3,37.5) 203.07,37.5 206.15,40.58 206.15,56.85 v1(205.5,57.5) ; v1(202.148,67.819) 204.881,67.819 205.5,67.2 v1(205.5,61)
"UPR 6R RPR TTL": DC4.A26 R198.1 | length 92.5
  Bottom Layer w0.254: DC4.A26@196.15,5.121 196.25,5.121 197.523,6.394 197.523,10.588 200.143,13.208 214.479,13.208 217.853,16.582 217.853,70.947 216.029,72.771 v1(209.424,72.771)
"UPR 7R RPR": DC4.C14 R203.2 U74.3 | length 105.6
  Top Layer w0.254: DC4.C14@166.15,10.121 166.15,13.15 170.3,17.3 175.574,17.3 196.738,38.464 196.738,88.862 196.172,89.428 U74.3@192.448,89.428 188.972,89.428 187.671,90.729 v1(186.399,90.729)
"UPR 7R RPR TTL": DC4.B26 R207.1 | length 144.7
  Top Layer w0.254: DC4.B26@196.15,7.621 197.523,8.994 197.523,10.588 200.597,13.662 214.291,13.662 217.399,16.77 217.399,82.773 216.473,83.699 216.473,85.327 v1(216.4,85.4)
  Bottom Layer w0.254: v1(184.499,92.897) 184.499,99.699 187.321,102.521 198.772,102.521 209.393,91.9 214.6,91.9 216.4,90.1 v1(216.4,85.4)
"UPR 8R RM": DC4.C8 R145.2 U69.9 | length 93.1
  Top Layer w0.254: v1(167.4,34.7) 164.17,37.93 164.17,85.87 164.505,86.205 U69.9@166.15,86.205 170.267,86.205 v1(172.399,88.336)
  Bottom Layer w0.254: DC4.C8@151.15,10.121 151.15,18.42 167.4,34.67 v1(167.4,34.7)
"UPR 8R RM TTL": DC4.B20 R149.1 | length 136.7
  Top Layer w0.254: v1(174.299,86.159) 178.309,86.159 178.814,85.654 178.814,37.99 180.892,35.912 180.892,32.838 181.3,32.43 v1(181.3,31.1)
  Bottom Layer w0.254: DC4.B20@181.15,7.621 182.5,8.971 182.5,11.242 190.993,19.735 208.135,19.735 211.246,22.846 211.246,29.554 208.5,32.3 198.4,32.3 198.154,32.546 190.072,32.546 188.572,31.046 182.674,31.046 182.501,30.873 181.899,30.873 181.672,31.1 v1(181.3,31.1)
"UPR 8R RPR": DC4.A15 R204.2 U74.6 | length 104.1
  Top Layer w0.254: DC4.A15@168.65,5.121 169.9,6.371 169.9,11.8 171.2,13.1 v1(171.2,15.8) ; v1(172.6,18.1) 172.7,18 175.6,18 196.284,38.684 196.284,85.016 195.471,85.829 U74.6@192.448,85.829 189.724,85.829 188.121,84.226 v1(186.399,84.226)
  Bottom Layer w0.254: v1(171.2,15.8) 171.2,16.7 v1(172.6,18.1)
"UPR 8R RPR TTL": DC4.C26 R208.1 | length 120.2
  Bottom Layer w0.254: v1(184.499,88.562) 184.499,88.201 185.2,87.5 186.593,87.5 188.972,85.121 188.972,81.528 191.3,79.2 199,79.2 206.4,71.8 215.707,71.8 217.399,70.108 217.399,16.77 214.291,13.662 199.691,13.662 DC4.C26@196.15,10.121
"UPR 9R RM": DC4.A9 R146.2 U69.10 | length 102.6
  Top Layer w0.254: v1(168.5,33.207) 167.619,33.207 163.716,37.11 163.716,86.561 164.66,87.504 U69.10@166.15,87.504 168.504,87.504 171.514,90.514 v1(172.399,90.514)
  Bottom Layer w0.254: DC4.A9@153.65,5.121 152.4,6.371 152.4,19.028 166.579,33.207 v1(168.5,33.207)
"UPR 9R RM TTL": DC4.C20 R150.1 | length 142.8
  Top Layer w0.254: v1(174.299,92.692) 178.389,92.692 179.268,91.813 179.268,38.178 181.346,36.1 181.346,33.026 182.2,32.172 v1(182.2,31.6) ; DC4.C20@181.15,10.121 181.15,11.962 182.638,13.45 185.48,13.45 187.172,15.142 187.172,15.601 187.598,16.027 188.057,16.027 190.51,18.48 v1(192.9,18.48)
  Bottom Layer w0.254: v1(182.2,31.6) 182.3,31.5 188.384,31.5 189.884,33 198.6,33 198.754,32.846 209.154,32.846 211.7,30.3 211.7,22.584 208.302,19.186 193.606,19.186 v1(192.9,18.48)
"UPR 9R RPR": DC4.B15 R205.2 U74.9 | length 104.2
  Top Layer w0.254: v1(172,13.9) 172,14.4 v1(173.8,16.2) ; v1(179.9,15.7) 179.9,16.366 181.361,17.827 181.453,17.827 199.916,36.29 199.916,85.716 200.029,85.829 U74.9@202.148,85.829 204.013,85.829 206.745,88.562 v1(207.524,88.562)
  Bottom Layer w0.254: DC4.B15@168.65,7.621 169.9,8.871 169.9,11.8 v1(172,13.9) ; v1(173.8,16.2) 177.7,16.2 178.2,15.7 v1(179.9,15.7)
"UPR 9R RPR TTL": DC4.A27 R209.1 | length 104.8
  Top Layer w0.254: DC4.A27@198.65,5.121 200.023,6.494 200.023,10.588 202.189,12.754 214.667,12.754 218.307,16.394 218.307,85 216.913,86.394 216.012,86.394 215.991,86.373 v1(209.445,86.373) R209.1@209.424,86.394
"UPR 10R RM": DC4.B9 R155.2 U70.3 | length 125.8
  Top Layer w0.254: v1(149.599,114.238) 150.332,114.238 152.533,112.036 U70.3@156.25,112.036 159.664,112.036 160.538,111.162 160.538,35.736 162.939,33.335 162.977,33.335 165.237,31.075 165.237,25.929 162.435,23.127 159.499,23.127 159.253,22.881 158.511,22.881 152.3,16.67 152.3,8.971 DC4.B9@153.65,7.621
"UPR 10R RM TTL": DC4.A21 R159.1 | length 196.4
  Top Layer w0.254: v1(179.6,101.7) 180.176,101.124 180.176,38.624 183.3,35.5 v1(183.3,33.5) ; DC4.A21@183.65,5.121 184.321,5.121 185.023,5.823 185.023,10.588 185.683,11.248 185.906,11.248 189,14.342 v1(189,15.8)
  Bottom Layer w0.254: v1(147.699,119.171) 147.699,118.501 148.3,117.9 151.088,117.9 152.5,116.488 152.5,106.9 157.7,101.7 v1(179.6,101.7) ; v1(183.3,33.5) 184.2,32.6 188.2,32.6 189.838,34.238 199.61,34.238 200.094,33.754 210.683,33.754 212.859,31.578 212.859,21.342 209.795,18.278 194.368,18.278 193.389,17.299 193.003,17.299 192.985,17.281 190.911,17.281 189.43,15.8 v1(189,15.8)
"UPR 10R RPR": DC4.C15 R206.2 U74.10 | length 104.6
  Top Layer w0.254: v1(178.4,14.9) 178.8,15.3 178.8,15.908 181.173,18.281 181.265,18.281 199.462,36.478 199.462,86.362 200.229,87.129 U74.10@202.148,87.129 204.67,87.129 205.754,88.212 205.754,90.183 206.3,90.729 v1(207.524,90.729)
  Bottom Layer w0.254: DC4.C15@168.65,10.121 168.65,12.11 171.159,14.619 171.689,14.619 172.47,15.4 177.316,15.4 177.816,14.9 v1(178.4,14.9)
"UPR 10R RPR TTL": DC4.B27 R210.1 | length 128.4
  Bottom Layer w0.254: DC4.B27@198.65,7.621 200.023,8.994 200.023,10.588 202.189,12.754 214.667,12.754 218.307,16.394 218.307,101.993 216.7,103.6 212.35,103.6 210.6,101.85 210.6,94.073 v1(209.424,92.897)
"UPR 11R RM": DC4.C9 R156.2 U70.6 | length 117.9
  Top Layer w0.254: v1(149.599,106.838) 151.784,106.838 153.383,108.437 U70.6@156.25,108.437 159.001,108.437 160.084,107.354 160.084,35.548 162.751,32.881 162.789,32.881 164.783,30.887 164.783,26.117 162.247,23.581 158.569,23.581 157.788,22.8 157.2,22.8 v1(155,20.6)
  Bottom Layer w0.254: DC4.C9@153.65,10.121 153.65,19.25 v1(155,20.6)
"UPR 11R RM TTL": DC4.B21 R160.1 | length 185.2
  Top Layer w0.254: v1(178.6,100.8) 178.7,100.8 179.722,99.778 179.722,38.436 181.8,36.358 181.8,33.6 v1(182.9,32.5) ; v1(185.4,12.3) 186.2,12.3 187.899,13.999 v1(187.899,15.3)
  Bottom Layer w0.254: v1(147.699,111.771) 147.699,111.401 148.6,110.5 151.3,110.5 152.046,109.754 152.046,106.712 157.512,101.246 178.154,101.246 v1(178.6,100.8) ; v1(182.9,32.5) 183.658,32.5 184.012,32.146 188.388,32.146 190.026,33.784 199.422,33.784 199.906,33.3 209.9,33.3 212.405,30.795 212.405,22.647 208.49,18.732 193.794,18.732 193.627,18.565 193.627,18.179 193.201,17.753 192.815,17.753 192.797,17.735 190.334,17.735 189.126,16.527 188.698,16.527 188.273,16.101 188.273,15.674 v1(187.899,15.3) ; DC4.B21@183.65,7.621 185,8.971 185,11.9 v1(185.4,12.3)
"UPR 11R RPR": DC4.A16 R228.2 U76.3 | length 128
  Top Layer w0.254: DC4.A16@171.15,5.121 172.3,6.271 172.3,10.365 174.419,12.484 174.419,14.861 197.646,38.088 197.646,108.654 194.264,112.036 U76.3@192.448,112.036 189.185,112.036 187.205,114.016 v1(186.399,114.016)
"UPR 11R RPR TTL": DC4.C27 R226.1 | length 168.6
  Top Layer w0.254: v1(184.499,118.802) 184.499,124.199 186.7,126.4 210.8,126.4 v1(214.1,123.1) ; DC4.C27@198.65,10.121 201.737,13.208 214.479,13.208 217.853,16.582 217.853,83.347 217.4,83.8 v1(217.4,84.176) ; v1(217.2,100.376) v1(217.2,105.1)
  Bottom Layer w0.254: v1(214.1,123.1) 218.307,118.893 218.307,107.215 217.501,106.41 217.41,106.41 217.2,106.2 v1(217.2,105.1) ; v1(217.2,100.376) 217.2,98.7 217.853,98.047 217.853,84.629 v1(217.4,84.176)
"UPR 12R RM": DC4.A10 R157.2 U70.9 | length 126.3
  Top Layer w0.254: v1(155.6,17.9) 157.973,20.273 157.973,21.701 158.699,22.427 159.773,22.427 v1(159.8,22.4) ; v1(169.5,28.8) 170.126,29.426 170.126,30.038 164.106,36.059 164.067,36.059 163.262,36.864 163.262,107.954 163.745,108.437 U70.9@165.95,108.437 168.837,108.437 171.443,111.043 171.443,111.543 171.671,111.771 v1(172.649,111.771)
  Bottom Layer w0.254: v1(155.6,17.9) 155.023,17.323 155.023,6.248 DC4.A10@156.15,5.121 ; v1(159.8,22.4) 160.7,22.4 166.564,28.264 168.334,28.264 168.87,28.8 v1(169.5,28.8)
"UPR 12R RM TTL": DC4.C21 R161.1 | length 160.5
  Top Layer w0.254: v1(174.549,109.304) 179.696,109.304 180.63,108.37 180.63,38.844 183.772,35.702 183.772,34.299 183.8,34.271 183.8,34.2 v1(184.5,33.5)
  Bottom Layer w0.254: DC4.C21@183.65,10.121 183.65,11.75 186.428,14.528 188.8,14.528 191.099,16.827 193.173,16.827 193.191,16.845 193.577,16.845 194.556,17.824 212.097,17.824 213.313,19.04 213.313,31.766 210.871,34.208 200.282,34.208 199.798,34.692 186.434,34.692 185.242,33.5 v1(184.5,33.5)
"UPR 12R RPR": DC4.B16 R231.2 U76.6 | length 122.2
  Top Layer w0.254: v1(173.2,12.7) 173.2,14.284 197.192,38.276 197.192,107.008 195.763,108.437 U76.6@192.448,108.437 189.787,108.437 188.188,106.838 v1(186.399,106.838)
  Bottom Layer w0.254: DC4.B16@171.15,7.621 172.3,8.771 172.3,11.253 173.2,12.153 v1(173.2,12.7)
"UPR 12R RPR TTL": DC4.A28 R229.1 | length 176.8
  Bottom Layer w0.254: v1(184.499,111.623) 186.463,111.623 189.3,114.46 189.3,122.9 191.2,124.8 215.6,124.8 219.215,121.185 219.215,16.018 214.997,11.8 203.735,11.8 202.523,10.588 202.523,6.494 DC4.A28@201.15,5.121
"UPR 13R RM": DC4.B10 R158.2 U70.10 | length 125.5
  Top Layer w0.254: DC4.B10@156.15,7.621 155.023,8.748 155.023,16.223 158.7,19.9 v1(158.7,21.4) ; v1(169.162,29.86) 169.162,30.36 163.917,35.605 163.879,35.605 162.808,36.676 162.808,109.044 163.501,109.736 U70.10@165.95,109.736 168.936,109.736 170.6,111.4 170.6,113.7 171.138,114.238 v1(172.649,114.238)
  Bottom Layer w0.254: v1(158.7,21.4) 158.7,22.338 165.08,28.718 168.146,28.718 169.162,29.734 v1(169.162,29.86)
"UPR 13R RM TTL": DC4.A22 R162.1 | length 169.5
  Top Layer w0.254: v1(174.549,116.704) 179.888,116.704 181.084,115.508 181.084,39.032 184.499,35.617 v1(184.499,34.6) ; v1(189.5,12.8) 192.2,15.5 v1(192.2,16.1)
  Bottom Layer w0.254: v1(184.499,34.6) 185.7,34.6 186.246,35.146 199.986,35.146 200.47,34.662 211.059,34.662 213.767,31.954 213.767,18.852 212.285,17.37 194.744,17.37 193.765,16.391 193.379,16.391 193.088,16.1 v1(192.2,16.1) ; DC4.A22@186.15,5.121 187.523,6.494 187.523,10.588 189.5,12.565 v1(189.5,12.8)
"UPR 13R RPR": DC4.C16 R234.2 U76.9 | length 122.1
  Top Layer w0.254: v1(177.015,14.673) 177.015,14.765 180.985,18.735 181.077,18.735 199.008,36.666 199.008,107.937 199.508,108.437 U76.9@202.148,108.437 204.237,108.437 205.1,109.3 205.1,110.472 206.92,112.292 v1(207.524,112.292)
  Bottom Layer w0.254: DC4.C16@171.15,10.121 171.15,11.75 174.073,14.673 v1(177.015,14.673)
"UPR 13R RPR TTL": DC4.B28 R232.1 | length 122.5
  Top Layer w0.254: DC4.B28@201.15,7.621 202.523,8.994 202.523,10.588 204.235,12.3 214.855,12.3 218.761,16.206 218.761,106.768 217.577,107.952 v1(209.424,107.952)
"UPR 14R RM": DC4.C10 R167.2 U71.3 | length 143
  Top Layer w0.254: v1(149.599,134.545) 151.155,134.545 151.467,134.233 U71.3@156.25,134.233 158.767,134.233 161.446,131.554 161.446,36.112 163.315,34.243 163.353,34.243 166.746,30.85 166.746,22.588 160.458,16.3 157.3,16.3 156.15,15.15 DC4.C10@156.15,10.121
"UPR 14R RM TTL": DC4.B22 R171.1 | length 211.2
  Top Layer w0.254: v1(179.7,123.3) 179.7,122.6 181.538,120.762 181.538,39.22 185.158,35.6 v1(185.3,35.6) ; DC4.B22@186.15,7.621 187.5,8.971 187.5,12.2 v1(190.1,14.8)
  Bottom Layer w0.254: v1(147.699,138.941) 148.94,137.7 150.6,137.7 152.9,135.4 152.9,129.894 159.494,123.3 v1(179.7,123.3) ; v1(185.3,35.6) 200.174,35.6 200.658,35.116 213.042,35.116 214.221,33.937 214.221,18.664 212.473,16.916 194.932,16.916 193.953,15.937 193.567,15.937 192.43,14.8 v1(190.1,14.8)
"UPR 14R RPR": DC4.A17 R237.2 U76.10 | length 135.2
  Top Layer w0.254: v1(175.6,13.5) 175.6,14.286 198.554,37.24 198.554,108.752 ; U76.10@202.148,109.736 199.538,109.736 198.554,108.752 ; v1(207.524,118.802) 201.602,118.802 198.554,115.754 198.554,108.752
  Bottom Layer w0.254: DC4.A17@173.65,5.121 174.9,6.371 174.9,12.8 v1(175.6,13.5)
"UPR 14R RPR TTL": DC4.C28 R235.1 | length 144.2
  Bottom Layer w0.254: DC4.C28@201.15,10.121 203.329,12.3 214.855,12.3 218.761,16.206 218.761,120.997 215.758,124 212.3,124 208.4,120.1 208.4,115.486 v1(209.424,114.462)
"UPR 15R RM": DC4.A11 R168.2 U71.6 | length 146.8
  Top Layer w0.254: R168.2@149.599,127.952 151.448,127.952 154.13,130.634 U71.6@156.25,130.634 160.412,130.634 160.992,130.054 160.992,35.924 163.127,33.789 163.165,33.789 166.292,30.662 166.292,22.776 160.738,17.222 157.084,17.222 v1(156.662,16.8)
  Bottom Layer w0.254: v1(156.662,16.8) 156.662,13.739 157.5,12.901 157.5,6.271 DC4.A11@158.65,5.121
"UPR 15R RM TTL": DC4.C22 R172.1 | length 204.1
  Top Layer w0.254: R172.1@147.699,132.347 v1(147.7,132.348) ; v1(181,122.5) 181.446,122.5 181.992,121.954 181.992,39.408 184.922,36.478 v1(185.7,36.478)
  Bottom Layer w0.254: v1(147.7,132.348) 149.803,132.348 159.652,122.5 v1(181,122.5) ; v1(185.7,36.478) 199.938,36.478 200.846,35.57 213.23,35.57 214.675,34.125 214.675,18.476 212.661,16.462 195.12,16.462 194.141,15.483 193.755,15.483 192.28,14.008 189.308,14.008 186.15,10.85 DC4.C22@186.15,10.121
"UPR 15R RPR": DC4.B17 R215.2 U75.3 | length 147.7
  Top Layer w0.254: DC4.B17@173.65,7.621 174.9,8.871 174.9,13.172 174.873,13.199 174.873,14.673 198.1,37.9 v1(198.1,125.6) ; v1(186.399,134.416) 188.384,134.416 188.649,134.151 U75.3@192.448,134.151 196.778,134.151 198.1,132.829 v1(198.1,130.977)
  Bottom Layer w0.254: v1(198.1,125.6) v1(198.1,130.977)
"UPR 15R RPR TTL": DC4.A29 R219.1 | length 181.3
  Bottom Layer w0.254: v1(184.499,138.756) 184.499,141.599 186.8,143.9 198.3,143.9 208.697,133.503 208.697,133.485 209.582,132.6 216.276,132.6 219.669,129.207 219.669,15.829 215.088,11.248 205.683,11.248 204.9,10.465 204.9,6.371 DC4.A29@203.65,5.121
"UPR C": DC4.B12 R180.2 U72.6 | length 62.5
  Top Layer w0.254: DC4.B12@161.15,7.621 162.523,8.994 162.523,13.723 v1(162.6,13.8) ; v1(163.3,16.6) 163.372,16.6 168.323,21.551 173.925,21.551 188.9,36.526 188.9,40.154 189.146,40.4 v1(190.4,40.4) ; v1(186.399,42.717) 187.606,42.717 188.674,43.786 v1(192.448,43.786)
  Bottom Layer w0.254: v1(162.6,13.8) 162.6,15.9 v1(163.3,16.6) ; v1(190.4,40.4) 189.9,40.4 189.254,41.046 189.254,43.254 189.786,43.786 v1(192.448,43.786)
"UPR C TTL": DC4.A24 R184.1 | length 115.9
  Bottom Layer w0.254: v1(184.499,47.012) 185.587,48.1 188.1,48.1 189.6,49.6 189.6,57.3 192.027,59.727 214.673,59.727 216.491,57.909 216.491,17.268 213.793,14.57 196.505,14.57 192.523,10.588 192.523,6.494 DC4.A24@191.15,5.121